# Altium PCB TELEX_CORE_LEFT_V2.0_0817.PcbDoc
Units mil, origin at the board's own origin, x right, y up, seen from the top; angles counter-clockwise.
Board outline 1377.95 x 984.25 mil, 4 copper layers (Top Layer, GND, PWR, Bottom Layer), stack 23.756 mil thick; 71 components, 45 nets, 272 pads, 101 vias.
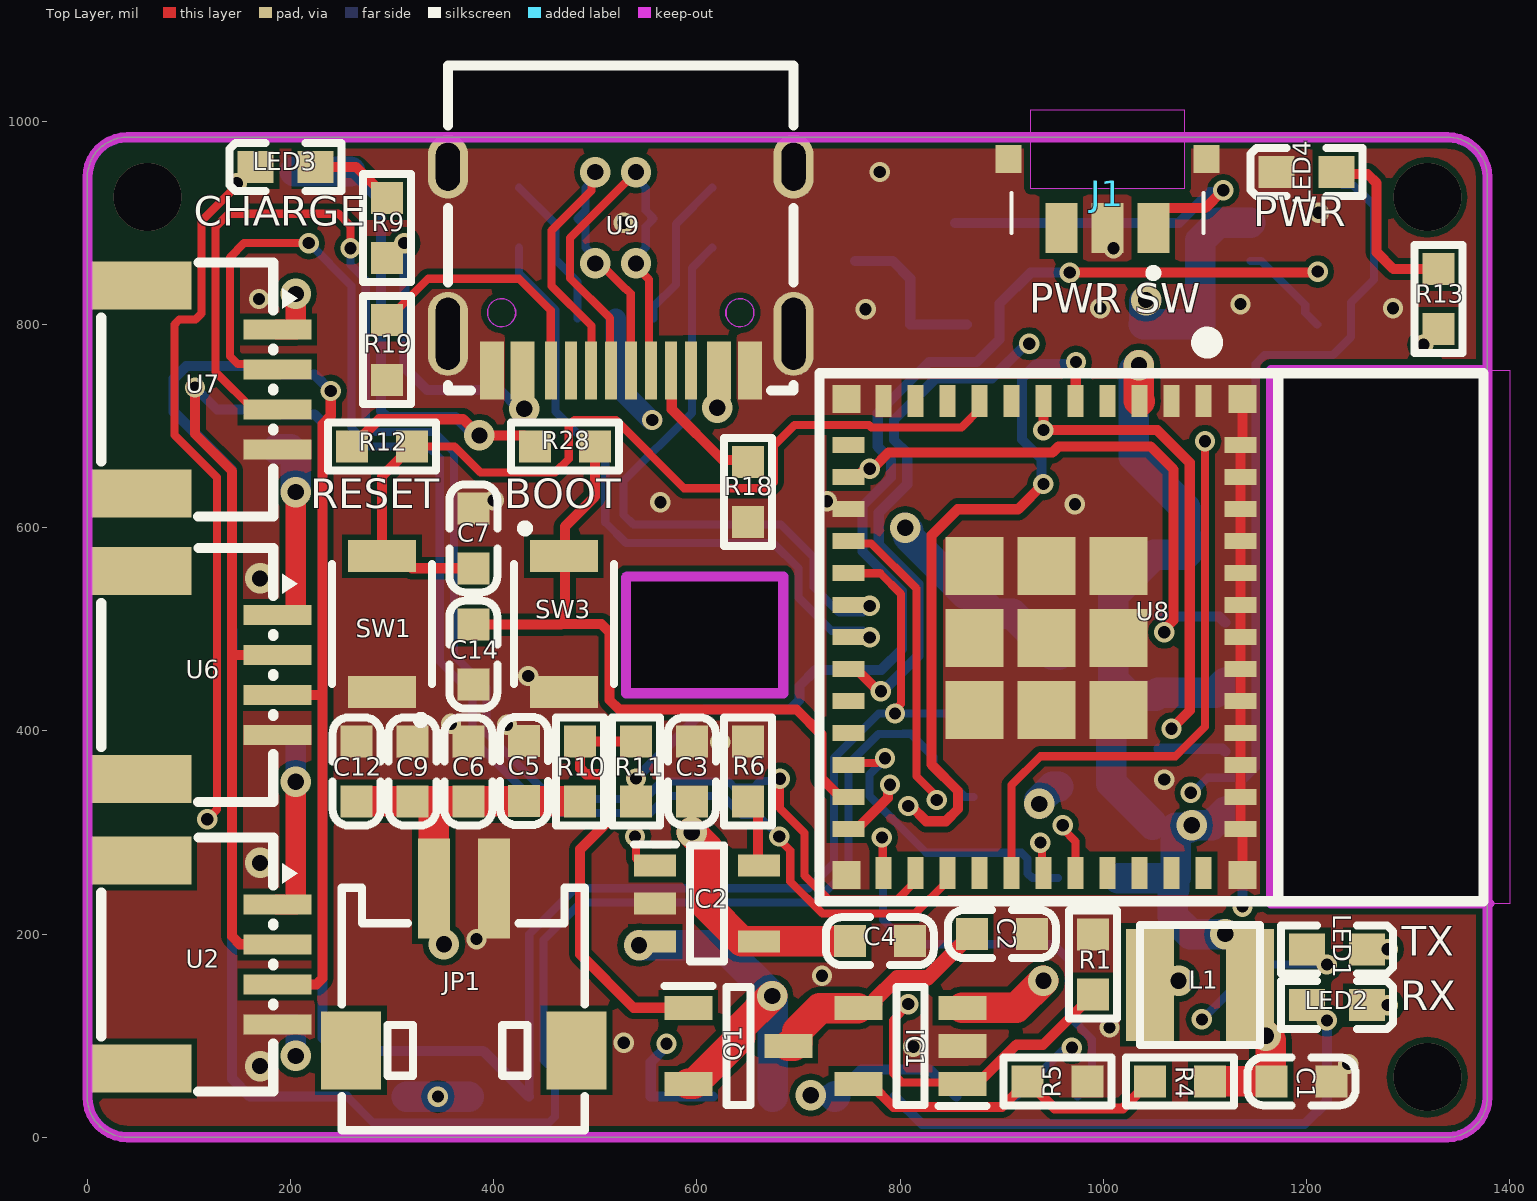
[diagram p0: Top Layer view]
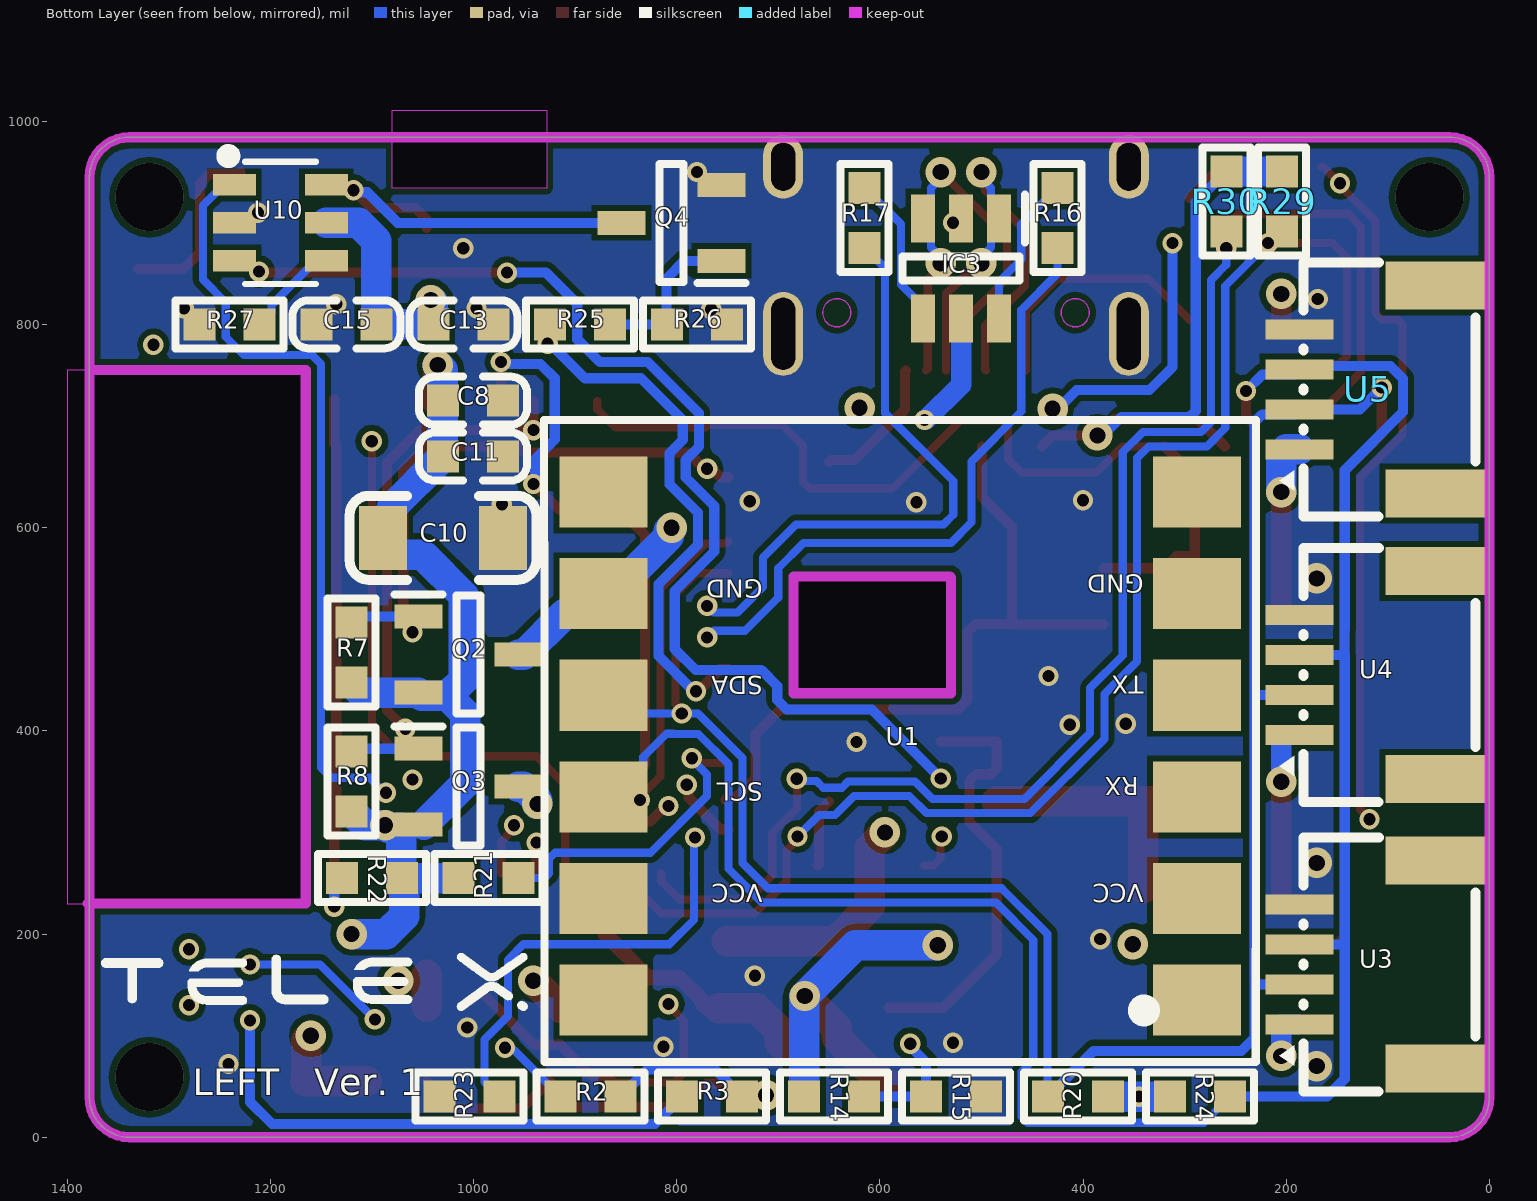
[diagram p1: Bottom Layer view, seen from below]
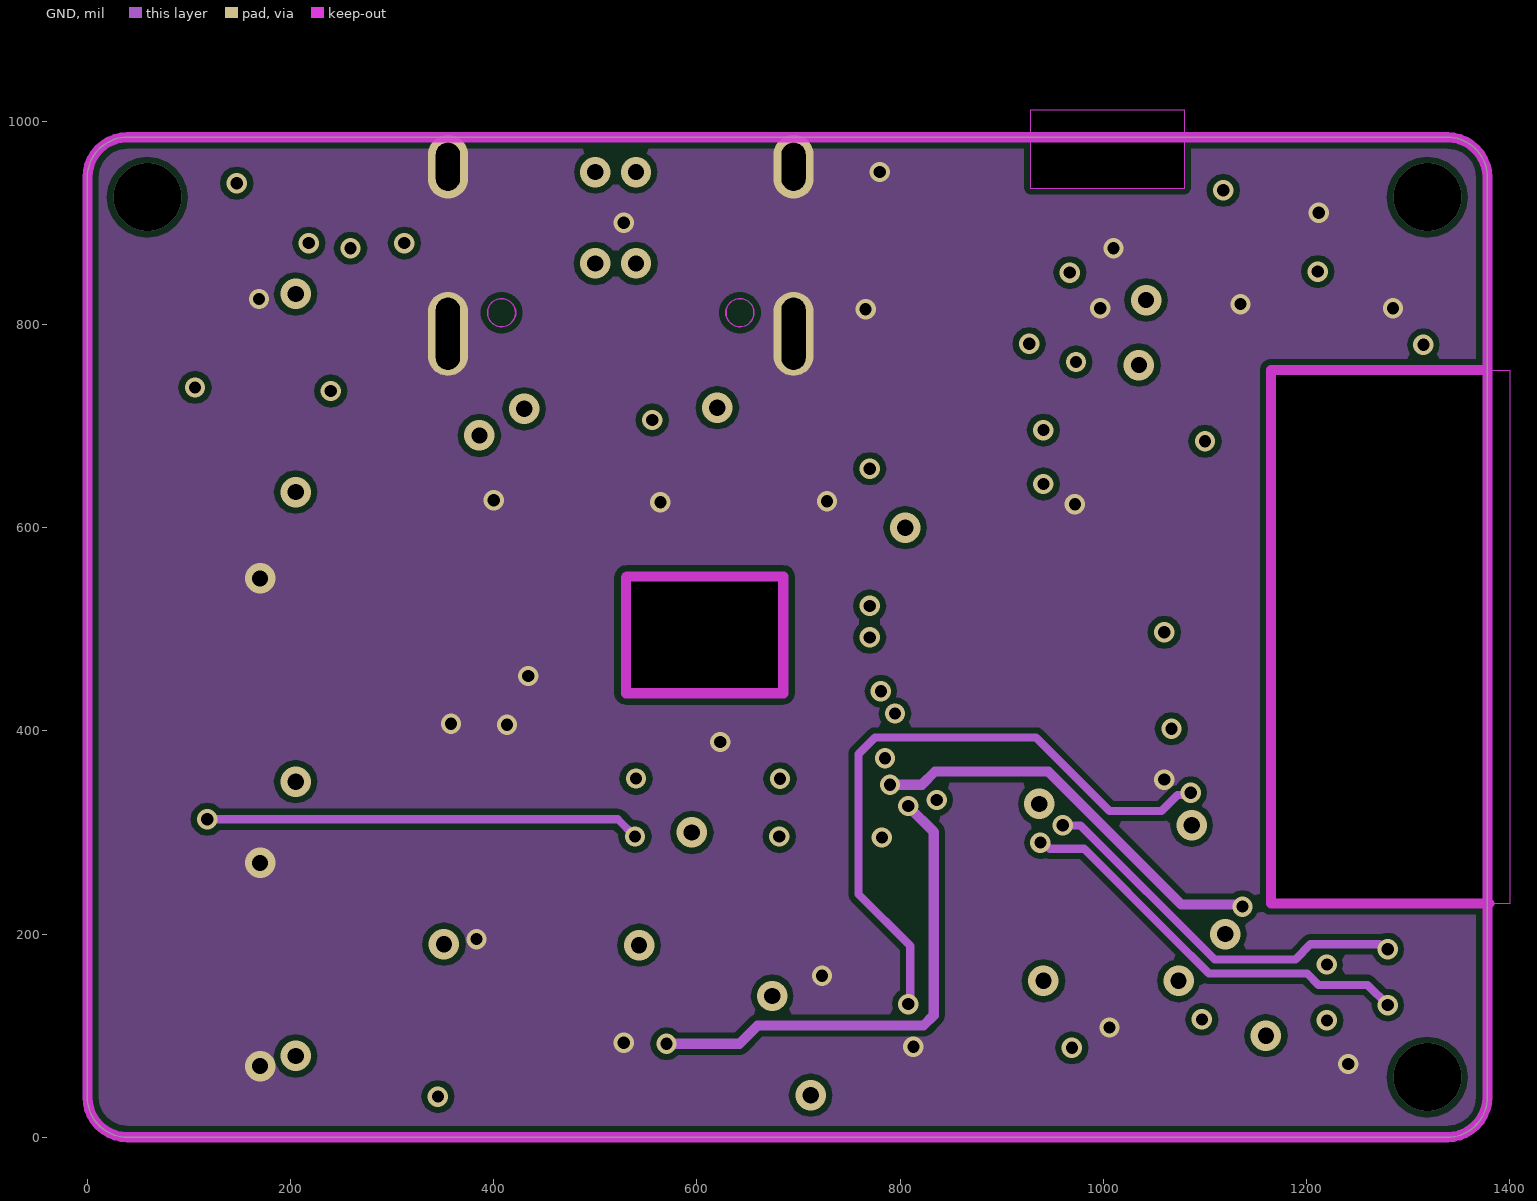
[diagram p2: GND]
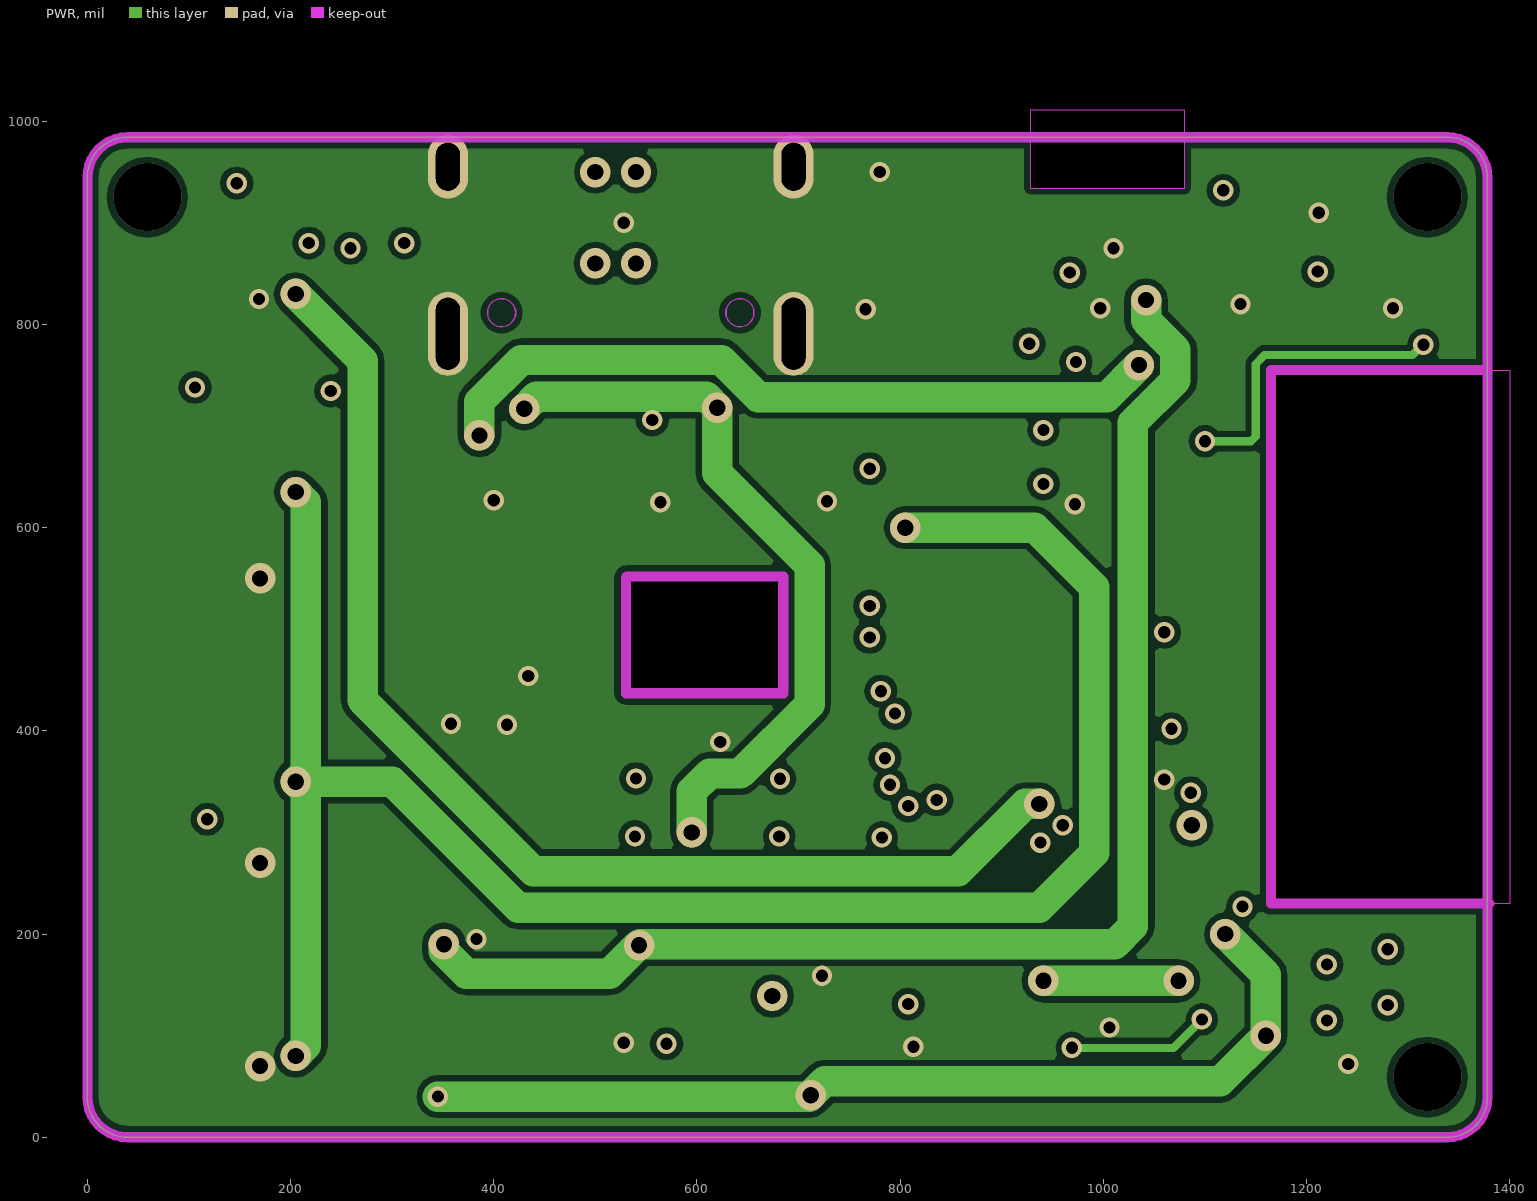
[diagram p3: PWR]
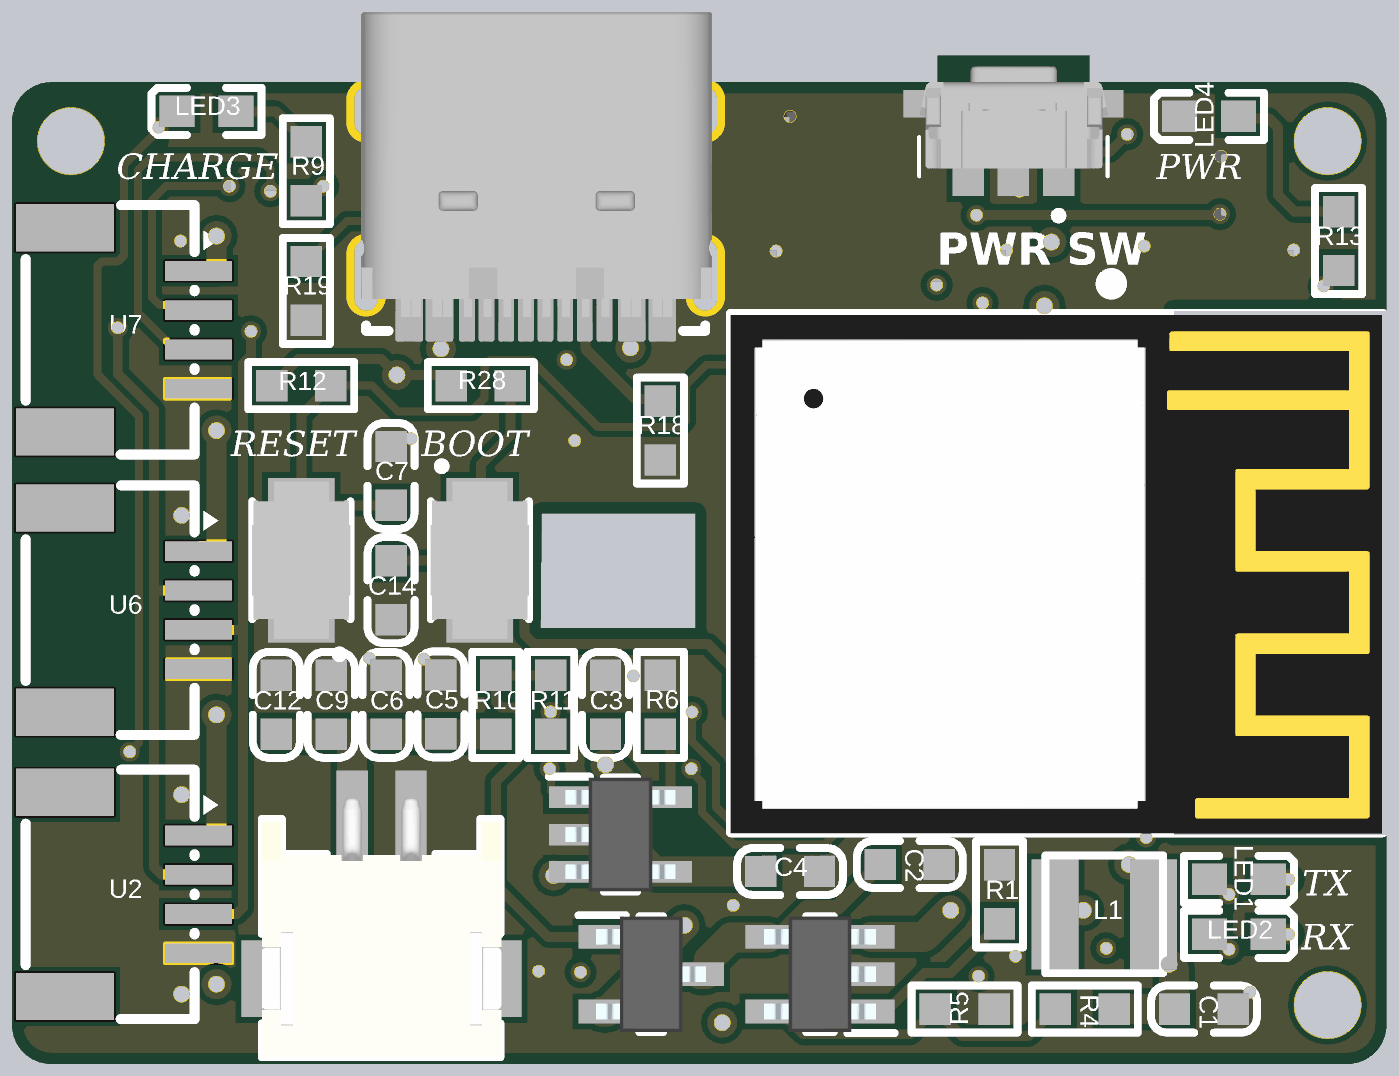
[diagram p4: 3D render of the assembled board from above, using the file's embedded part models]
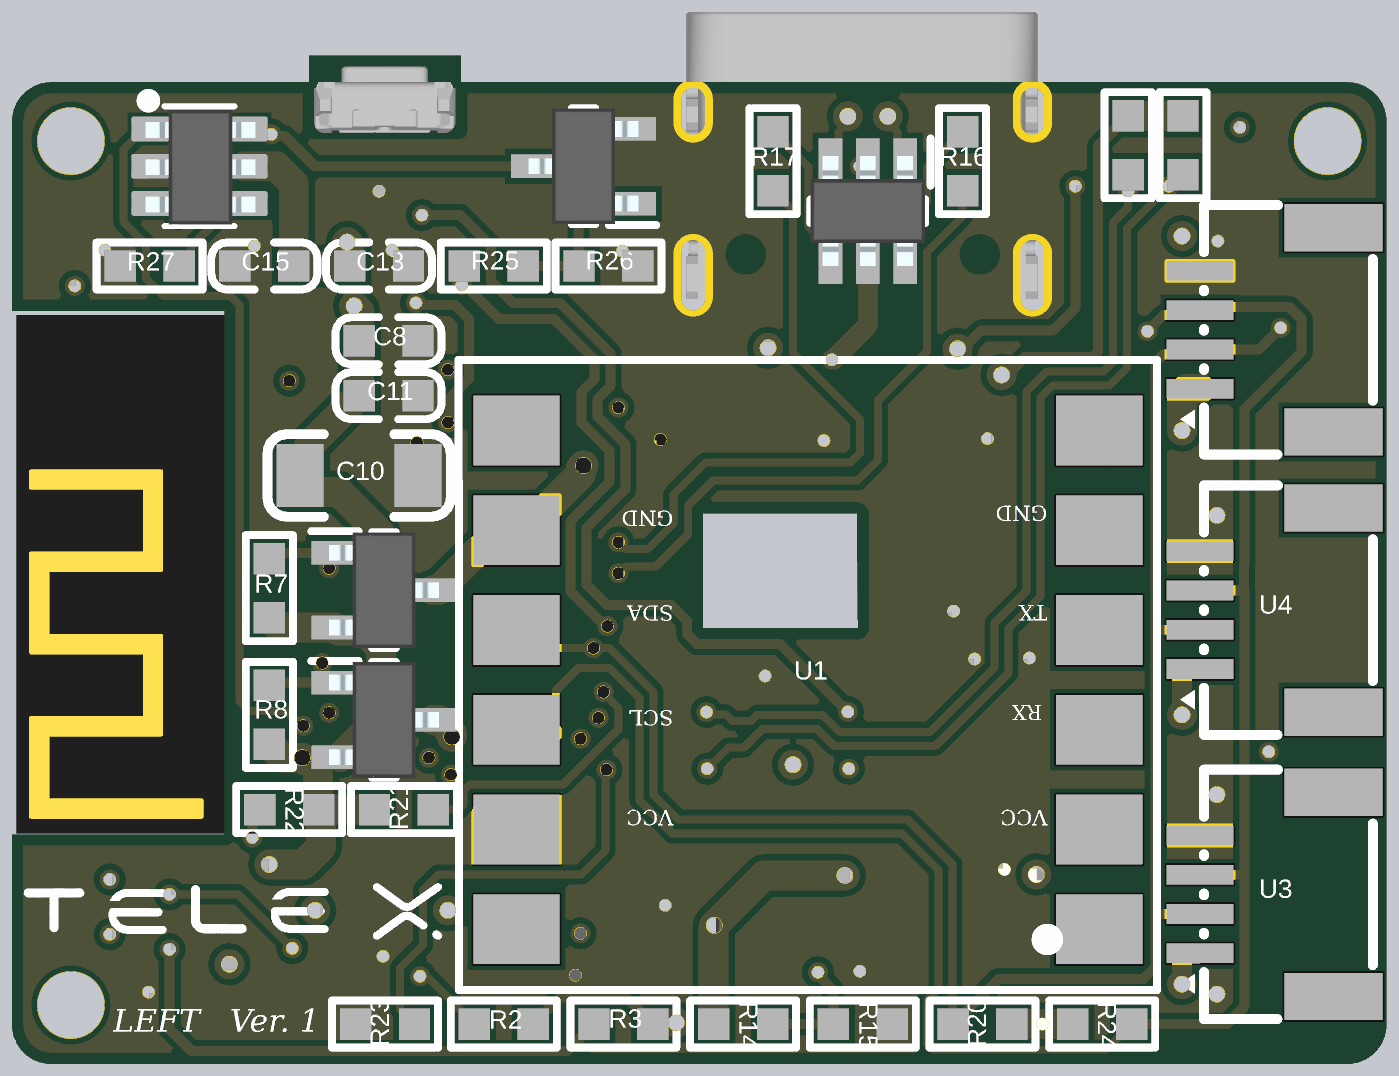
[diagram p5: 3D render of the assembled board from below, using the file's embedded part models]

## Layer stack, top to bottom
Top Solder: solder mask 0.4, Solder Resist, Dk 3.5
Top Layer: signal copper 1.4
Dielectric 2: prepreg 2.8, PP-006, Dk 4.1
GND: signal copper 1.378
Dielectric 1: dielectric 12.6, FR-4, Dk 4.8
PWR: signal copper 1.378
Dielectric 3: prepreg 2.8, PP-006, Dk 4.1
Bottom Layer: signal copper 1.4
Bottom Solder: solder mask 0.4, Solder Resist, Dk 3.5

## Board outline
39.37,0 cw(c39.37,39.37) 0,39.37 0,944.88 cw(c39.37,944.88) 39.37,984.25 1338.58,984.25 cw(c1338.58,944.88) 1377.95,944.88 1377.95,39.37 cw(c1338.58,39.37) 1338.58,0
cut-out: 928,1011 928,934 1080,934 1080,1011
cut-out: 1165,755 1400,755 1400,230 1165,230
cut-out: 530,437 685,437 685,552 531,552

## Design rules (kind name [scope] priority, off if disabled: settings)
Clearance [All] p1: gap=6 ignorepadtopadclearanceinfootprint=TRUE except(0: Arc-Text Track-Text SMDPad-Text THPad-Text Via-Text Fill-Text Poly-Text Region-Text Text-Text)
DiffPairsRouting [All] p1: maxlimit=10 minlimit=10 mostfreqgap=10 toplayer_minwidth=5 toplayer_maxwidth=15 toplayer_prefwidth=15 midlayer1_minwidth=5 midlayer1_maxwidth=15 midlayer1_prefwidth=15 midlayer2_minwidth=5 midlayer2_maxwidth=15 midlayer2_prefwidth=15 bottomlayer_minwidth=5 bottomlayer_maxwidth=15 bottomlayer_prefwidth=15 maxuncoupledlength=500
HoleToHoleClearance [All] p1: gap=0 allowstackedmicrovias=TRUE
MinimumSolderMaskSliver [All] p1: minsoldermaskwidth=0
PolygonConnect [All] p1: connectstyle=Direct reliefconductorwidth=10 reliefentries=4 polygonreliefangle="90 Angle" airgapwidth=10
RoutingVias [All] p1: holewidth=28 width=50 viastyle="Through Hole" minholewidth=28 minwidth=50 maxholewidth=28 maxwidth=50
SilkToSilkClearance [All] p1: silktosilkclearance=0
SilkToSolderMaskClearance [IsPad] p1: minsilkscreentomaskgap=0 clearancetoexposedcopper=TRUE
SolderMaskExpansion [All] p1: expansion=0 istentingtop=FALSE
SupplyNets "Schematic Supply Nets_4" [InNet('VUSB')] p1: voltage=0.000
SupplyNets "Schematic Supply Nets_3" [InNet('VIN')] p2: voltage=0.000
SupplyNets "Schematic Supply Nets_2" [InNet('+3.3V')] p3: voltage=0.000
SupplyNets "Schematic Supply Nets_1" [InNet('VBAT')] p4: voltage=0.000
SupplyNets "Schematic Supply Nets" [InNet('GND')] p5: voltage=0.000
Width [All] p1: maxlimit=9999 minlimit=5 preferedwidth=10 minimp=50.000000 maximp=50.000000 favimp=50.000000
25 further rules are at their usual default settings.

## Classes and differential pairs
differential pair PROC: +PROC_P -PROC_N
differential pair D: +D_P -D_N

## Components (designator, comment, footprint, x,y, rotation, side; value= is the part's Value field where it differs from the comment)
C1 "22uF" C0603 1195,55 r180 top
C2 "10uF" C0603 900,200 r0 top
C3 "10nF" C0603 595,360 r270 top
C4 "100nF" C0603 780,193 r180 top
C5 "22uF" C0603 430,360.47 r270 top
C6 "22uF" C0603 375,360 r270 top
C7 "1uF" C0603 380,589.53 r90 top
C8 "10uF" C0603 1000.47,725 r0 bottom
C9 "100nF" C0603 320,360 r270 top
C10 "100uF" C1206 1030,590 r0 bottom
C11 "100nF" C0603 1000.47,670 r0 bottom
C12 "22uF" C0603 265,360 r270 top
C13 "100nF" C0603 1010,800 r0 bottom
C14 "1uF" C0603 380,475 r270 top
C15 "1uF" C0603 1125,800 r180 bottom
IC1 "SY8089AAC" SOT95P285X140-5N 810,90 r180 top
IC2 "TP4054-42-SOT25-R" SOT95P280X100-5N 610,230 r0 top
IC3 "USBLC6-2SC6" SOT95P280X145-6N 520,855 r270 bottom
J1 "EVPAEDB2A" EVPAEJB2A 1003.94,915 r180 top
JP1 "HDR-1X2" ZH1.5-WS-2P 370.47,85.55 r0 top
L1 "2.2uH" L3030 1095,150 r180 top
LED1 "LED_RED" LED0603_RED 1230,185 r0 top
LED2 "LED_GREEN" LED0603_GREEN 1230,130 r0 top
LED3 "LED_BLUE" LED0603_BLUE 195,955 r180 top
LED4 "LED_BLUE" LED0603_BLUE 1200,950 r180 top
Q1 "AO3401A" SOT95P280X125-3N 640.79,90 r0 top
Q2 "AO3401A" SOT95P280X125-3N 1005,475 r180 bottom
Q3 "AO3401A" SOT95P280X125-3N 1005,345 r180 bottom
Q4 "AO3400A" SOT95P280X125-3N 805,900 r0 bottom
R1 "100K" R0603 990,170 r270 top
R2 "1K" R0603 885,40 r0 bottom
R3 "1K" R0603 765,40 r0 bottom
R4 "450K" R0603 1075.47,55 r0 top
R5 "100K" R0603 955,55 r0 top
R6 "2K" R0603 650,360 r270 top
R7 "10K" R0603 1120,477 r90 bottom
R8 "10K" R0603 1120,350 r90 bottom
R9 "1K" R0603 295,895 r90 top
R10 "10K" R0603 485,360 r90 top
R11 "100Ω" R0603 540,360 r270 top
R12 "10K" R0603 290,680 r0 top
R13 "2K" R0603 1330,825 r90 top
R14 "10K" R0603 645,40 r180 bottom
R15 "22K" R0603 525,40 r180 bottom
R16 "22Ω" R0603 425,905 r90 bottom
R17 "22Ω" R0603 615,905 r90 bottom
R18 "5.1K" R0603 650,635 r90 top
R19 "5.1K" R0603 295,775 r90 top
R20 "4.7K" R0603 405,40 r0 bottom
R21 "10K" R0603 985,255 r0 bottom
R22 "10K" R0603 1100,255 r180 bottom
R23 "10K" R0603 1004,40 r0 bottom
R24 "4.7K" R0603 285,40 r180 bottom
R25 "1K" R0603 895,800 r0 bottom
R26 "47K" R0603 780,800 r0 bottom
R27 "10K" R0603 1240,800 r180 bottom
R28 "10K" R0603 470,680 r0 top
R29 "4.7K" R0603 204,921 r270 bottom
R30 "4.7K" R0603 259,921 r270 bottom
SW1 "B3U-1000P" B3U-1000P 290,505 r270 top
SW3 "B3U-1000P" B3U-1000P 469,505 r90 top
U1 "JY901S" JY901S 580,385 r0 bottom
U2 "SH1.0-4P" SH1.0-4PWT 120,170 r270 top
U3 "SH1.0-4P" SH1.0-4PWT 120,170 r90 bottom
U4 "SH1.0-4P" SH1.0-4PWT 120,455 r90 bottom
U5 "SH1.0-4P" SH1.0-4PWT 120,736 r90 bottom
U6 "SH1.0-4P" SH1.0-4PWT 120,455 r270 top
U7 "SH1.0-4P" SH1.0-4PWT 120,736 r270 top
U8 "ESP32-C6-MINI-1" ESP32-C6-MINI-1 942.09,492.13 r270 top locked
U9 "TYPE-C" USB-C-SMD_TYPEC-304-BCP16 525,855 r180 top locked
U10 "UOV-K20" UOV-K20 1190,900 r270 bottom

## Footprints (in the part's own frame and the unit in brackets; to place one, negate y for a bottom-side part, rotate by r counter-clockwise, add the part's x,y. Pads: shape width x height; smd on the part's side, far side on the other; paste and mask are expansions set on the pad)
B3U-1000P [mm] "两脚小龟"
  rect 0.8x1.7 smd: 1(1.7,0) 2(-1.7,0)
  silkscreen extent -1.5,-1.25 2.49,1.25, body extent -2,-1.25 2,1.25, height 1.6
C0603 [mm] "Chip Capacitor, 2-Leads, Body 1.6x0.8mm, IPC Medium Density"
  rect 0.8x0.8 smd: 1(-0.75,0) 2(0.75,0)
  silkscreen extent -1.35,-0.6 1.35,0.6, body extent -1.26,-0.4 1.26,0.4, height 0.5
C1206 [mm] "Chip Capacitor, 2-Leads, Body 3.2x1.6mm, IPC Medium Density"
  rect 1.2x1.6 smd: 1(-1.5,0) 2(1.5,0)
  silkscreen extent -2.33,-1.05 2.33,1.05, body extent -1.6,-0.8 1.6,0.8, height 1
ESP32-C6-MINI-1 [mm] "带天线"
  rect 0.8x0.4 smd paste+0 mask+0.05: 1(-5.9,3.975) 2(-5.9,3.175) 3(-5.9,2.375) 4(-5.9,1.575) 5(-5.9,0.775) 6(-5.9,-0.025) 7(-5.9,-0.825) 8(-5.9,-1.625) 9(-5.9,-2.425) 10(-5.9,-3.225) 11(-5.9,-4.025) 25(5.9,-4.025) 26(5.9,-3.225) 27(5.9,-2.425) 28(5.9,-1.625) 29(5.9,-0.825) 30(5.9,-0.025) 31(5.9,0.775) 32(5.9,1.575) 33(5.9,2.375) 34(5.9,3.175) 35(5.9,3.975)
  rect 0.4x0.8 smd paste+0 mask+0.05: 12(-4.8,-4.9) 13(-4,-4.9) 14(-3.2,-4.9) 15(-2.4,-4.9) 16(-1.6,-4.9) 17(-0.8,-4.9) 18(0,-4.9) 19(0.8,-4.9) 20(1.6,-4.9) 21(2.4,-4.9) 22(3.2,-4.9) 23(4,-4.9) 24(4.8,-4.9) 36(4.8,4.9) 37(4,4.9) 38(3.2,4.9) 39(2.4,4.9) 40(1.6,4.9) 41(0.8,4.9) 42(0,4.9) 43(-0.8,4.9) 44(-1.6,4.9) 45(-2.4,4.9) 46(-3.2,4.9) 47(-4,4.9) 48(-4.8,4.9)
  rect 1.45x1.45 smd paste+0 mask+0.05: 49(-1.775,1.85) 49(-1.775,0.05) 49(-1.775,-1.75) 49(0.025,1.85) 49(0.025,0.05) 49(0.025,-1.75) 49(1.825,1.85) 49(1.825,0.05) 49(1.825,-1.75)
  rect 0.7x0.7 smd paste+0 mask+0.05: 50(5.95,4.95) 51(5.95,-4.95) 52(-5.95,-4.95) 53(-5.95,4.95)
  silkscreen extent -7.57,-5.62 6.6,10.98, body extent -6.57,-5.64 6.63,10.96, height 2.46
EVPAEJB2A [mm]
  rect 0.8x1.25 smd: 1(-1.15,0.512) 2(0,0.512) 3(1.15,0.512)
  rect 0.65x0.7 smd: 4(-2.475,-1.213) 5(2.475,-1.213)
  silkscreen extent -2.4,-0.36 2.4,1.74, body extent -2.41,-2.16 2.39,0.44, height 0.97
JY901S [mil]
  rect 86.61x70 smd paste+0 mask+1.97: 1(-292.13,250) 2(-292.13,150) 3(-292.13,50) 4(-292.13,-50) 5(-292.13,-150) 6(-292.13,-250) 7(292.14,-250) 8(292.14,-150) 9(292.14,-50) 10(292.14,50) 11(292.14,150) 12(292.14,250)
  silkscreen extent -350,-321 351,311, body extent -294,-304 306,296, height 119
L3030 [mm]
  rect 1.2x2.8 smd: 1(-1.25,0) 2(1.25,0)
  silkscreen extent -1.5,-1.5 1.5,1.5, body extent -1.5,-1.5 1.5,1.5, height 1.2
LED0603_BLUE [mm]
  rect 0.9x0.8 smd: 1(-0.75,0) 2(0.75,0)
  silkscreen extent -1.4,-0.6 1.4,0.6, body extent -1.3,-0.41 1.3,0.41, height 0.54
LED0603_GREEN [mm]
  rect 0.9x0.8 smd: 1(-0.75,0) 2(0.75,0)
  silkscreen extent -1.4,-0.6 1.4,0.6, body extent -1.3,-0.41 1.3,0.41, height 0.54
LED0603_RED [mm]
  rect 0.9x0.8 smd: 1(-0.75,0) 2(0.75,0)
  silkscreen extent -1.4,-0.6 1.4,0.6, body extent -1.3,-0.41 1.3,0.41, height 0.54
R0603 [mm] "Chip Capacitor, 2-Leads, Body 1.6x0.8mm, IPC Medium Density"
  rect 0.8x0.8 smd: 1(-0.75,0) 2(0.75,0)
  silkscreen extent -1.35,-0.6 1.35,0.6, body extent -1.3,-0.4 1.3,0.4, height 0.4
SH1.0-4PWT [mm]
  rect 0.5x1.7 smd paste+0 mask+0.05: 1(-1.5,1.7) 2(-0.5,1.7) 3(0.5,1.7) 4(1.5,1.7)
  rect 1.2x2.5 smd paste+0 mask+0.05: 5(2.6,-1.7) 6(-2.6,-1.7)
  silkscreen extent -3.18,-2.7 3.18,2.21
SOT95P280X100-5N [mm]
  rect 1.05x0.55 smd: 1(-1.3,0.95) 2(-1.3,0) 3(-1.3,-0.95) 4(1.3,-0.95) 5(1.3,0.95)
  silkscreen extent -1.83,-1.45 0.43,1.48, body extent -1.4,-1.45 1.4,1.45, height 1
SOT95P280X125-3N [mm]
  rect 1.2x0.6 smd: 1(-1.25,0.95) 2(-1.25,-0.95) 3(1.25,0)
  silkscreen extent -1.85,-1.48 0.3,1.5, body extent -1.4,-1.48 1.4,1.48, height 1.25
SOT95P280X145-6N [mm]
  rect 1.2x0.6 smd: 1(-1.25,0.95) 2(-1.25,0) 3(-1.25,-0.95) 4(1.25,-0.95) 5(1.25,0) 6(1.25,0.95)
  silkscreen extent -1.85,-1.46 0.3,1.6, body extent -1.4,-1.46 1.4,1.46, height 1.45
SOT95P285X140-5N [mm]
  rect 1.2x0.6 smd: 1(-1.3,0.95) 2(-1.3,0) 3(-1.3,-0.95) 4(1.3,-0.95) 5(1.3,0.95)
  silkscreen extent -1.9,-1.48 0.35,1.5, body extent -1.43,-1.48 1.43,1.48, height 1.4
UOV-K20 [mil]
  rect 20.95x42.2 smd paste+2: 1(-37.4,-45.24) 2(0,-45.24) 3(37.4,-45.24) 4(37.4,45.24) 5(0,45.24) 6(-37.4,45.24)
  silkscreen extent -72,-57 60,35, body extent -57,-54 59,56, height 57
USB-C-SMD_TYPEC-304-BCP16 [mm]
  oval 1x2.1 hole 0.6 slot 1.8 at 90 deg paste-2539.97: 13(-4.32,1.633) 14(4.32,1.633)
  oval 1x1.6 hole 0.6 slot 1.2 at 90 deg paste-2539.97: 15(-4.32,-2.547) 16(4.32,-2.547)
  rect 0.6x1.45 smd paste+0.051: A1B12(-3.225,2.547) A4B9(-2.45,2.547) B1A12(3.22,2.547) B4A9(2.45,2.547)
  rect 0.3x1.45 smd paste+0.051: A5(-1.25,2.547) A6(-0.25,2.547) A7(0.25,2.547) A8(1.25,2.547) B5(1.75,2.547) B6(0.75,2.547) B7(-0.75,2.547) B8(-1.75,2.547)
  Keep-Out Layer circle w0.003: c-2.98,1.103 r0.35
  Keep-Out Layer circle w0.003: c2.98,1.103 r0.35
  Keep-Out Layer region: -2.63,1.103 -2.63,1.033 -2.683,0.904 -2.782,0.806 -2.91,0.753 -3.05,0.753 -3.178,0.806 -3.277,0.904 -3.33,1.033 -3.33,1.103 -3.33,1.172 -3.277,1.301 -3.178,1.399 -3.05,1.453 -2.91,1.453 -2.782,1.399 -2.683,1.301 -2.63,1.172 -2.63,1.103 -2.63,1.103
  Keep-Out Layer region: -2.63,1.103 -2.63,1.033 -2.683,0.904 -2.782,0.806 -2.91,0.753 -3.05,0.753 -3.178,0.806 -3.277,0.904 -3.33,1.033 -3.33,1.103 -3.33,1.172 -3.277,1.301 -3.178,1.399 -3.05,1.453 -2.91,1.453 -2.782,1.399 -2.683,1.301 -2.63,1.172 -2.63,1.103 -2.63,1.103
  Keep-Out Layer region: 3.33,1.103 3.33,1.033 3.277,0.904 3.178,0.806 3.05,0.753 2.911,0.753 2.782,0.806 2.683,0.904 2.63,1.033 2.63,1.103 2.63,1.172 2.683,1.301 2.782,1.399 2.911,1.453 3.05,1.453 3.178,1.399 3.277,1.301 3.33,1.172 3.33,1.103 3.33,1.103
  Keep-Out Layer region: 3.33,1.103 3.33,1.033 3.277,0.904 3.178,0.806 3.05,0.753 2.911,0.753 2.782,0.806 2.683,0.904 2.63,1.033 2.63,1.103 2.63,1.172 2.683,1.301 2.782,1.399 2.911,1.453 3.05,1.453 3.178,1.399 3.277,1.301 3.33,1.172 3.33,1.103 3.33,1.103
  silkscreen extent -4.32,-5.08 4.32,3.05, body extent -4.5,-5.06 4.44,2.69, height 3.2
ZH1.5-WS-2P [mm] "����6.1mm�����2.5mm���ߣ�3.7mm"
  rect 1.5x1.95 smd: 0(-2.818,0) 0(2.818,0)
  rect 0.8x2.5 smd: 1(-0.75,4.05) 2(0.75,4.05)
  silkscreen extent -3.05,-2 3.03,4.06, body extent -3.05,-2 3.05,4.6, height 3.75

## Part data
C1 C2 C3 C4 C5 C6 C7 C8 C9 C10 C11 C12 C13 C14 C15: library part CC, "瓷片电容", 品牌=muRata, 材质=X7R, 类别=电容, 精度=20%, 耐压=25V
IC1: "Integrated Circuit", Manufacturer_Name=Silergy, Datasheet Link=https://datasheet.lcsc.com/szlcsc/Silergy-Corp-SY8089AAAC_C78988.pdf, Height=1.4mm, Manufacturer_Part_Number=SY8089AAC
IC2: "Integrated Circuit", Manufacturer_Name="TOP POWER", Datasheet Link=http://images.100y.com.tw/pdf_file/38-TP-TP4054x.pdf, Height=1mm, Manufacturer_Part_Number=TP4054-42-SOT25-R
IC3: "Integrated Circuit", Manufacturer_Name=STMicroelectronics, Mouser Part Number=511-USBLC6-2SC6, Arrow Part Number=USBLC6-2SC6, Arrow Price/Stock=https://www.arrow.com/en/products/usblc6-2sc6/stmicroelectronics.html?utm_currency=USD&region=nac, Datasheet Link=https://www.st.com/resource/en/datasheet/usblc6-2.pdf, Height=1.45mm, Manufacturer_Part_Number=USBLC6-2SC6, Mouser Price/Stock=https://www.mouser.co.uk/ProductDetail/STMicroelectronics/USBLC6-2SC6?qs=po45yt2pPpu%2FhNIlwQdTlg%3D%3D
J1: "Connector", Manufacturer_Name=Panasonic, Arrow Part Number=EVPAEDB2A, Arrow Price/Stock=https://www.arrow.com/en/products/evp-aedb2a/panasonic, Datasheet Link=https://industry.panasonic.com/ac/cdn/e/control/switch/light-touch/catalog/sw_lt_eng_4522s_side_eg.pdf, Height=1.75mm, Manufacturer_Part_Number=EVPAEDB2A
JP1: library part "Header 2", "2P接插件", BOM名称=2P接插件, 学习资源=www.ooocke.com, 版权归属=源创客
L1: library part LG, "功率电感", 品牌=顺络, 类别=电感, 精度=20%, 高度=2.0
LED1: "发光二极管（红）"
LED2: "发光二极管（绿）"
LED3 LED4: "发光二极管（蓝）"
Q1 Q2 Q3: "MOSFET (P-Channel)", Manufacturer_Name="Alpha & Omega Semiconductors", Arrow Part Number=AO3401A, Arrow Price/Stock=https://www.arrow.com/en/products/ao3401a/alpha-and-omega-semiconductor.html?utm_currency=USD&region=europe, Datasheet Link=http://www.aosmd.com/pdfs/datasheet/AO3401A.pdf, Height=1.25mm, Manufacturer_Part_Number=AO3401A
Q4: "MOSFET (N-Channel)", Manufacturer_Name="Alpha & Omega Semiconductors", Arrow Part Number=AO3400A, Arrow Price/Stock=https://www.arrow.com/en/products/ao3400a/alpha-and-omega-semiconductor?utm_currency=USD&region=nac, Datasheet Link=http://aosmd.com/res/data_sheets/AO3400A.pdf, Height=1.25mm, Manufacturer_Part_Number=AO3400A
R1 R2 R3 R4 R5 R6 R7 R8 R9 R10 R11 R12 R13 R14 R15 R16 R17 R18 R19 R20 R21 R22 R23 R24 R25 R26 R27 R28 R29 R30: library part R, "贴片电阻", 品牌=国巨, 材质=薄膜, 类别=电阻, 精度=1%

## Via types
v1: diameter 20, hole 12, Top Layer to Bottom Layer, tented both sides, 70 vias
v2: diameter 30, hole 16, Top Layer to Bottom Layer, tented both sides, 28 vias
v3: diameter 66.93, hole 66.93, Top Layer to Bottom Layer, tented both sides, 3 vias

## Nets (pads, with @x,y where several pads share a name; then routed paths per layer and width w, separated by ;. In a path a pad name is that pad's centre, name@x,y a point inside that pad or via, vN(x,y) a via of type N, cw(c..) or ccw(c..) an arc to the next point about the centre after c; other vN are vias at no path point)
+3.3V: C1.2 C8.2 C10.2 C11.2 L1.1 Q2.2 Q3.2 R2.1 R3.1 R4.2 R7.1 R8.1 R12.1 R20.1 R21.2 R22.2 R24.1 R28.1 R29.1 R30.1 U8.3 | length 3536.1
  Top Layer w10: R12.1 287.22,706.75 369.86,706.75 v2(385.86,690.75) 429.72,690.75 R28.1
  Top Layer w30: v2(1035,760) 1035,725 U8.3 ; R4.2 C1.2 1164.72,55.75 1164.72,95.28 v2(1160,100)
  PWR w30: v1(345,40) 710.63,40 725.63,55 1115,55 v2(1160,100) 1160,160 v2(1120,200) ; v2(385.86,690.75) 385.86,723.77 427.09,765 623.91,765 660.53,728.38 1003.38,728.38 v2(1035,760)
  Bottom Layer w10: R30.1 289,920.53 289,714.86 294.86,709 362.2,709 380.45,690.75 v2(385.86,690.75) ; R3.1@744.65,49.17 762.22,66.75 828.72,66.75 844.72,50.75 R2.1
  Bottom Layer w30: R29.1 R30.1 ; R24.1 v1(345,40) R20.1 ; R3.1 R3.1@736,40.53 ; R21.2 R22.2 ; v2(1035,760) 1030,755 C8.2 C11.2 1080.43,619.57 1080.43,590.75 1089.06,582.13 1080.43,573.5 1050.18,573.5 1009.59,532.91 1009.59,450.39 1025.57,434.41 ; Q3.2@1048.78,307.6 1008,348.38 1008,416.84 1025.57,434.41 ; 1071.22,291.22 1071.22,255.75 R22.2 ; Q3.2@1071.22,304.41 1084.41,304.41 v2(1087,307) 1106.53,307 R8.1 ; v2(1120,200) 1085.76,200 1068.18,217.57 1068.18,242.43 1069.72,243.97 1069.72,254.25 R22.2 ; R7.1 1110.13,437.6 Q2.2 1051.02,434.41 1025.57,434.41
  other v2: 712,41.37
BAT: R14.2 R15.1 U8.5 | length 1292.7
  Top Layer w10: v1(808,326) 810.71,326 825.71,311 845,311 857,323 857,340.7 831,366.7 831,554.5 831,592.46 856.64,618.1 916.1,618.1 v1(941,643) ; U8.5 972.8,724.61 972.8,762.8 v1(973,763)
  GND w10: v1(570,92) 641.85,92 659.85,110 823,110 833,120 833,300.57 808,325.57 v1(808,326)
  Bottom Layer w10: v1(570,92) 570,89.29 554.53,73.82 R15.1 R14.2 ; v1(941,643) 939.09,644.91 939.09,667.62 920,686.71 920,747 934.09,761.09 971.09,761.09 v1(973,763)
D_N: IC3.3 U9.A7 U9.B7 | length 454.6
  Top Layer w8: U9.A7 514.32,755.55 514.32,806.14 475,845.46 475,885 v2(540,950) ; v2(540,860) 540,857.16 552.84,844.31 552.84,756.4 U9.B7
  Bottom Layer w8: v2(540,860) 540,865.95 549.59,875.54 549.59,896.4 IC3.3 549.59,912.02 549.59,934.46 540,944.05 v2(540,950)
D_P: IC3.1 U9.A6 U9.B6 | length 456.9
  Top Layer w8: U9.B6 496.32,755.55 496.32,798.68 457,838 457,892.46 496.18,931.64 496.18,946.18 v2(500,950) ; v2(500,860) 504.64,860 529.64,835 530.16,835 534.84,830.31 U9.A6
  Bottom Layer w8: v2(500,860) 500,865.95 490.41,875.54 490.41,896.4 IC3.1 490.41,912.02 490.41,934.46 500,944.05 v2(500,950)
GND: C1.1 C2.2 C3.1 C4.1 C5.1 C6.1 C7.2 C8.1 C9.1 C10.1 C11.1 C12.1 C13.1 C14.2 C15.1 IC1.2 IC2.2 IC3.2 J1.2 J1.4 J1.5 JP1.2 LED4.2 Q4.2 R1.1 R5.2 R6.1 R15.2 R18.1 R19.1 R23.2 R26.1 R27.1 SW1.1 SW3.2 U1.11 U2.4 U3.4 U4.4 U5.4 U6.4 U7.4 U8.1 U8.2 U8.11 U8.14 U8.36 U8.37 U8.38 U8.39 U8.40 U8.41 U8.42 U8.43 U8.44 U8.45 U8.46 U8.47 U8.48 U8.49 U8.50 U8.51 U8.52 U8.53 U9.13 U9.14 U9.15 U9.16 U9.A1B12 U9.B1A12 U10.2 | length 470.1
  Top Layer w10: U8.50 1136.97,301.18 U8.36 U8.37 U8.38 U8.39 U8.40 U8.41 U8.42 U8.43 U8.44 U8.45 U8.46 U8.47 U8.48 1136.97,683.07 U8.53
  other v1: 1241,72 813,89 528,93 1006,108 723,159 383,195 1060,352 623,389 413,406 358,407 434,454 972,623 564,625 728,626 400,627 766,815 997,816 1285,816 1135,820 169,825 1010,875 528,900 1212,910 780,950
  other v2: 170,70 170,270 170,550
IMU: Q2.3 U1.8 U2.1 U3.1 U4.1 U5.1 U6.1 | length 2556.8
  Top Layer w20: U2.1 204.84,229.05 205,229.21 v2(205,350) ; U6.1 204.84,514.05 205,514.21 v2(205,635)
  PWR w30: v2(205,80) 215,90 215,340 v2(205,350) ; v2(205,635) 215,625 215,360 v2(205,350) ; v2(805,600) 932.43,600 991,541.43 991,280.09 936.91,226 424,226 300,350 v2(205,350)
  Bottom Layer w20: U3.1 204.84,110.95 205,110.79 v2(205,80) ; U4.1 204.84,395.95 205,395.79 v2(205,350)
  Bottom Layer w30: U5.1 199.84,676.95 205,671.79 v2(205,635) ; v2(805,600) 807.83,597.17 807.83,591.3 843.83,555.3 843.83,555 863.83,535 U1.8 892.14,515 910.35,515 950.35,475 Q2.3
IMU_CTRL: Q2.1 R7.2 U8.13 | length 574.1
  Top Layer w10: U8.13 757.05,649.61 763.53,656.09 768.09,656.09 v1(770,658) 772.71,658 788.76,674.06 950.06,674.06 956,680 1046.37,680 1069,657.37 1069,508.71 1060,499.71 v1(1060,497)
  Bottom Layer w10: Q2.1 1114.13,512.4 R7.2
IR: Q3.3 U7.1 | length 1271.2
  Top Layer w20: U7.1 204.84,795.05 205,795.21 v2(205,830)
  PWR w30: v2(205,830) 271,764 271,429.91 438.91,262 857,262 923,328 v2(937,328)
  Bottom Layer w30: v2(937,328) 937,331.65 950.35,345 Q3.3
IR_CTRL: Q3.1 R8.2 U8.6 | length 522.1
  Top Layer w10: U8.6 U8.6 941.05,696.05 v1(941,696) 1053,696 1085,664 1085,420 v1(1067,402)
  Bottom Layer w10: Q3.1 1117.13,382.4 R8.2
KEY: J1.1 Q4.3 U10.6 | length 369.3
  Top Layer w10: J1.1@1046.28,894.84 1046.28,903.7 1057.02,914.45 1100.2,914.45 1117.75,932 v1(1118,932)
  Bottom Layer w10: Q4.3 1074.42,900 1104.53,930.11 1116.11,930.11 v1(1118,932)
LP_SCL: R29.2 U7.2 U8.27 | length 1414.7
  Top Layer w8: U7.2 181.6,761.01 147.99,761.01 140.28,768.72 140.28,866 154.28,880 v1(218,880) ; v1(681,296) 681,293.22 691.85,282.37 691.85,251.73 723.49,220.09 814.74,220.09 846.62,251.97 U8.27
  Bottom Layer w8: v1(218,880) 260,838 260,698 278,680 335.32,680 346.86,668.46 346.86,468.34 379,436.2 379,391.92 451.92,319 554.08,319 571.08,336 625.42,336 644.27,317.15 659.85,317.15 v1(681,296)
LP_SDA: R30.2 U7.3 U8.26 | length 1518.3
  Top Layer w8: U7.3 163.31,716.31 126.28,753.34 126.28,896.01 139.27,909 247,909 259,897 v1(259,875) ; v1(681.69,352.83) 681.69,323.6 705.85,299.43 705.85,257.53 729.29,234.09 797.24,234.09 815.12,251.97 U8.26
  Bottom Layer w8: v1(259,875) 259,858.8 274,843.8 274,703.8 283.8,694 341.12,694 360.86,674.26 360.86,474.14 393,442 393,397.72 457.72,333 548.28,333 565.28,350 631.22,350 637.22,344 655.69,344 662.22,350.53 679.39,350.53 v1(681.69,352.83)
NetC7_1: C7.1 R12.2 SW1.2 U8.8 | length 915.6
  Top Layer w8: R12.2 361.25,680 387,654.25 460.36,654.25 473.78,667.67 473.78,699.89 479.64,705.75 520.25,705.75 587.22,638.78 669.89,638.78 675.75,644.64 675.75,680.75 696,701 769.27,701 771.6,698.66 860.24,698.66 878.11,716.54 U8.8
  Top Layer w10: R12.2 290,650.47 SW1.2 307.72,571.93 319.65,560 C7.1
NetC14_1: C14.1 R28.2 SW3.1 U8.23 | length 697.5
  Top Layer w10: C14.1 466.31,504.53 ; R28.2 499.53,630.53 470,601 470,508.22 466.31,504.53 ; U8.23@752.05,331.77 U8.23 741.31,334.64 722.43,353.52 722.43,396.57 698,421 523.37,421 514,430.37 514,497 506,505 466.78,505 466.31,504.53
NetIC1_3: IC1.3 L1.2 | length 255.3
  Top Layer w30: IC1.3 914.4,127.4 v2(941,154) ; L1.2@1045.79,128.5 L1.2@1045.79,160
  PWR w30: v2(941,154) v2(1074,154)
NetIC1_5: IC1.5 R4.1 R5.1 | length 329.2
  Top Layer w10: IC1.5 770.63,52.6 793.44,29.79 900.26,29.79 R5.1 952.22,28.25 1019.2,28.25 R4.1
NetIC2_1: IC2.1 LED3.2 | length 1176.5
  Top Layer w8: v1(118,313) 127.47,322.47 127.47,649.53 85.74,691.26 85.74,800.05 90.42,804.74 106.42,804.74 112.28,810.6 112.28,901.81 151.76,941.28 151.76,943.25 163.5,955 LED3.2 ; v1(539,296) 540.15,294.85 540.15,274.23 546.98,267.4 IC2.1@556.82,267.4
  GND w8: v1(118,313) 522,313 v1(539,296)
  other v1: 147,939
NetIC2_5: IC2.5 R6.2 | length 67.7
  Top Layer w10: R6.2 660,320.47 660,268.58 IC2.5
NetIC3_4: IC3.4 R17.2 | length 152.6
  Bottom Layer w8: IC3.4 557.4,817.6 579.21,839.41 579.21,898.74 R17.2
NetIC3_6: IC3.6 R16.2 | length 152.6
  Bottom Layer w8: R16.2 460.79,898.74 460.79,863.86 482.6,842.05 IC3.6
NetLED1_1: LED1.1 R2.2 | length 359.3
  PWR w8: v1(969,88) 1069,88 v1(1097,116)
  Bottom Layer w8: R2.2 960.23,85.7 966.7,85.7 v1(969,88) ; v1(1097,116) 1151,170 v1(1220,170)
NetLED2_1: LED2.1 R3.2 | length 525.8
  Bottom Layer w10: R3.2 821.53,13 1198,13 1220,35 v1(1220,115)
NetLED3_1: LED3.1 R9.2 | length 83.1
  Top Layer w10: LED3.1 264.53,955 R9.2
NetLED4_1: LED4.1 R13.2 | length 179.9
  Top Layer w10: LED4.1 1231.53,948 1260,948 1269,939 1269,871 1285.47,854.53 R13.2
NetQ1_1: Q1.1 R10.2 R11.1 | length 423.5
  Top Layer w10: R11.1 R10.2 485,363.08 490.86,357.22 505.3,357.22 511.75,350.78 511.75,310.17 485,283.42 485,180 537.6,127.4 Q1.1
NetQ4_1: Q4.1 R25.1 R26.2 | length 162.6
  Bottom Layer w10: Q4.1 792.4,862.6 810,845 810,800.47 R26.2 R25.1
NetR13_1: R13.1 U8.29 | length 881.2
  Top Layer w8: U8.29 909.61,346.61 938,375 1071,375 1100,404 v1(1100,685)
  PWR w8: v1(1100,685) 1145.31,685 1150,689.69 1150,761.21 1158.79,770 1304.31,770 1314.31,780 v1(1315,780)
  Bottom Layer w8: v1@1312.83,777.83 v1(1315,780)
NetR18_2: R18.2 U9.A5 | length 135
  Top Layer w10: U9.A5 575.12,753.81 575.12,716.58 625.11,666.59 647.94,666.59 R18.2
NetR19_2: R19.2 U9.B5 | length 249.9
  Top Layer w8: R19.2 335.47,845 425,845 456.1,813.9 U9.B5
NetR21_1: R21.1 U8.22 | length 309.5
  Top Layer w8: U8.22 751.21,368.18 776.93,368.18 781.75,373 v1(785,373)
  Bottom Layer w8: v1(785,373) 785,371.89 770,356.89 770,335.72 825.71,280 919.59,280 925.44,274.14 925.44,259.69 930.13,255 R21.1
NetR22_1: R22.1 U8.24 | length 503.9
  Top Layer w10: U8.24 757.05,303.15 788.09,334.18 788.09,345.09 v1(790,347)
  GND w10: v1(790,347) 821.3,347 834.3,360 945.86,360 1076.94,228.91 1135.09,228.91 v1(1137,227)
  Bottom Layer w10: R22.1 1137,247.53 v1(1137,227)
NetR23_1: R23.1 U8.25 | length 466.6
  Top Layer w8: v1(782,295) 782.81,294.19 782.81,260.65 U8.25
  Bottom Layer w8: v1(782,295) 783,294 783,214.11 807.1,190 950.55,190 966,174.55 966,119.28 989,96.28 989,54.53 R23.1
NetR27_2: R27.2 U10.4 | length 96
  Bottom Layer w8: U10.4 1155.39,862.6 1198.72,819.27 1198.72,811.75 R27.2
OFF_FLAG: R11.2 U10.3 | length 1099.2
  Top Layer w10: v1(967,851) 1210,851 v1(1211,852)
  Bottom Layer w10: v1(540,353) 608,421 691.63,421 701,430.37 701,444.14 716.86,460 781.37,460 801.83,480.46 801.83,537.61 763,576.44 763,621.3 791,649.3 791,666.7 778,679.7 778,712.63 797.92,732.54 828.37,763 875.52,763 897.78,785.25 897.78,820.3 928.48,851 v1(967,851)
ON_FLAG: IC1.1 R1.2 U10.1 | length 1705.9
  Top Layer w8: v1(808,131) 808,129.89 793,114.89 793,63 802,54 859.78,54 IC1.1
  Top Layer w10: IC1.1 867.99,59.41 882.83,59.41 914.42,91 940.53,91 R1.2
  GND w8: v1(808,131) 810,133 810,188.12 759,239.12 759,377.28 775.22,393.51 933.56,393.51 1006.07,321 1057.28,321 1072.99,336.7 1083.7,336.7 v1(1086,339)
  Bottom Layer w8: v1(1086,339) 1087.55,339 1102.33,353.78 1139.89,353.78 1150,363.89 1150,761.21 1158.79,770 1226.11,770 1243.78,787.67 1243.78,821.72 1266.34,844.28 1266.34,916.93 1245.87,937.4 U10.1
POWER_CTRL: R25.2 U8.19 | length 521.3
  Top Layer w10: U8.19 757.05,460.63 778.69,439 v1(781,439)
  Bottom Layer w10: v1(781,439) 783,439 817.83,473.83 817.83,544.23 779,583.06 779,614.67 807,642.67 807,673.33 794,686.33 794,706 835,747 890.29,747 924.29,781 v1(927,781)
PROC_N: R17.1 U8.17 | length 603.5
  PWR w8: v1(770,523) v1@772,525
  Bottom Layer w8: R17.1 595,855.47 595,713 527.73,645.73 527.73,612.73 537.46,603 682.46,603 715,570.46 715,541.5 740,516.5 763.5,516.5 v1(770,523)
PROC_P: R16.1 U8.18 | length 629.4
  Bottom Layer w8: R16.1 425,850 460.79,814.21 460.79,714.21 509.73,665.27 509.73,605.27 530,585 675,585 700,560 700,531.04 732.54,498.5 763.5,498.5 v1(770,492)
RXD: LED2.2 U8.30 | length 439.7
  Top Layer w8: v1(938,290) 939.55,288.45 939.55,261.39 U8.30
  GND w8: v1(938,290) 941.25,290 947.25,284 980.85,284 1068.85,196 1101.85,163 1103.85,161 1200.72,161 1211.72,150 1260,150 v1(1280,130)
SCL: R20.2 U1.9 U2.2 U3.2 U4.2 U5.2 U6.2 U8.16 | length 2645.1
  Top Layer w8: U8.16 780.39,555.12 801,534.51 801,426.25 795,420.25 v1(795,417)
  Top Layer w10: v1(106,738) 106,692.21 142.47,655.75 142.47,475 ; U2.2 186.61,190 150,190 142.47,197.53 142.47,475 ; U6.2 142.79,474.68 142.47,475
  Bottom Layer w8: R20.2 435,40.47 435,200 480,245 710,245 735,270 735,373.08 778.92,417 854.14,417 U1.9
  Bottom Layer w10: v1(106,738) 127.68,716.32 U5.2 191.77,711.48 223.52,711.48 231.39,703.61 231.39,435 ; U3.2 231.07,150.32 231.39,150 ; U4.2 231.07,435.32 231.39,435 ; R20.2 389.53,85 244.01,85 231.39,97.61 231.39,150 ; 231.39,150 231.39,435
SDA: R24.2 U1.10 U2.3 U3.3 U4.3 U5.3 U6.3 U8.15 | length 3063
  Top Layer w8: U8.15 751.37,584.42 771.58,584.42 816,540 816,355.25 836,335.25 v1(836,332)
  Top Layer w10: U2.3 225.31,150.31 231.39,156.39 231.39,435 ; U6.3 231.08,435.31 231.39,435 ; v1(239.55,734.55) 239.55,710 231.39,701.84 231.39,435
  Bottom Layer w8: R24.2 281.22,14.25 454.42,14.25 460.28,20.11 460.28,64.72 449,76 449,194.2 485.8,231 715.8,231 749,264.2 749,367.28 778.72,397 803.28,397 803.4,397.11 810.03,397.11 832.83,374.31 832.83,366 863.83,335 U1.10
  Bottom Layer w10: U3.3 142.78,189.69 142.47,190 ; U4.3 142.78,474.69 ; v1(239.55,734.55) 223.25,750.85 191.77,750.85 U5.3 183.62,759 97.3,759 85,746.7 85,714 142.47,656.53 142.47,499.66 142.78,499.35 142.78,474.69 ; R24.2 160,40 142.47,57.53 142.47,190 ; 142.47,190 142.47,475 142.78,474.69
TXD: LED1.2 U8.31 | length 435.3
  Top Layer w8: v1(960,307) 960,303.75 972.6,291.15 U8.31
  GND w8: v1(960,307) 977.64,307 1109.64,175 1189,175 1204,190 1271.75,190 1276.75,185 v1(1280,185)
VBAT: C5.2 C6.2 C9.2 C12.2 C13.2 C15.2 IC2.3 JP1.1 Q1.2 R10.1 R14.1 U10.5 | length 2259.7
  Top Layer w30: C12.2 C9.2 340,330.47 ; JP1.1 340.94,329.53 340,330.47 ; R10.1 C6.2 340,330.47 ; Q1.2 597.01,52.6 642.62,98.21 642.62,107.75 673.87,139 v2(674,139)
  PWR w30: v2(351,190) 351,183.16 373.16,161 514,161 542,189 v2(543,189) 544,190 1011.43,190 1029,207.57 1029,703.09 1071,745.09 1071,774.91 1042,803.91 v2(1042,824)
  Bottom Layer w30: v2(543,189) 624,189 674.53,138.47 R14.1 ; v2(1042,824) 1040.28,822.28 1040.28,800.75 C13.2 C15.2 1095.47,882.43 1113.05,900 U10.5
VIN: C2.1 IC1.4 Q1.3 | length 234.5
  Top Layer w15: IC1.4@758.42,127 770.23,127 774.94,131.71 774.94,134.87 797.07,157 827.47,157 C2.1
  Top Layer w30: Q1.3 695.43,90 698.62,93.19 698.62,104.53 721.09,127 IC1.4@758.42,127
VUSB: C3.2 C4.2 IC2.4 IC3.5 R9.1 U9.A4B9 U9.B4A9 | length 1327.2
  Top Layer w30: v2(595,300) 610,285 610,227 644,193 C4.2
  PWR w30: v2(430,717) 442,729 609,729 v2(620,718) 620,653.77 711,562.77 711,426.23 642.77,358 612.57,358 595,340.43 v2(595,300)
  Bottom Layer w10: v1(312,880) 312,758 334.59,735.41 406.17,735.41 424.59,717 v2(430,717)
  Bottom Layer w20: IC3.5 520,740.71 554.71,706 v1(556,706)
pads on no net: J1.3 JP1.0 U1.1 U1.2 U1.3 U1.4 U1.5 U1.6 U1.7 U1.12 U2.5 U2.6 U3.5 U3.6 U4.5 U4.6 U5.5 U5.6 U6.5 U6.6 U7.5 U7.6 U8.4 U8.7 U8.9 U8.10 U8.12 U8.20 U8.21 U8.28 U8.32 U8.33 U8.34 U8.35 U9.A8 U9.B8
copper on no net:
  other v3: 1318.9,59.06 59.06,925.2 1318.9,925.2

## Polygon pours and split planes (outlines as drawn)
GND on Top Layer "GND_L01_P000" (solid, remove dead copper, pour order 0): 39.37,0 cw(c39.37,39.37) 0,39.37 0,944.88 cw(c39.37,944.88) 39.37,984.25 1338.58,984.25 cw(c1338.58,944.88) 1377.95,944.88 1377.95,39.37 cw(c1338.58,39.37) 1338.58,0
GND on GND "GND_L02_P001" (solid, remove dead copper, pour order 1): 39.37,0 cw(c39.37,39.37) 0,39.37 0,944.88 cw(c39.37,944.88) 39.37,984.25 1338.58,984.25 cw(c1338.58,944.88) 1377.95,944.88 1377.95,39.37 cw(c1338.58,39.37) 1338.58,0
GND on PWR "GND_L03_P002" (solid, remove dead copper, pour order 2): 39.37,0 cw(c39.37,39.37) 0,39.37 0,944.88 cw(c39.37,944.88) 39.37,984.25 1338.58,984.25 cw(c1338.58,944.88) 1377.95,944.88 1377.95,39.37 cw(c1338.58,39.37) 1338.58,0
GND on Bottom Layer "GND_L04_P003" (solid, remove dead copper, pour order 3): 39.37,0 cw(c39.37,39.37) 0,39.37 0,944.88 cw(c39.37,944.88) 39.37,984.25 1338.58,984.25 cw(c1338.58,944.88) 1377.95,944.88 1377.95,39.37 cw(c1338.58,39.37) 1338.58,0

## Keep-outs
Keep-Out Layer:
  lines w10: 1375,755 1165,755 1165,230 1380,230 ; 0,39.37 ccw(c39.37,39.37) 39.37,0 1338.58,0 ccw(c1338.58,39.37) 1377.95,39.37 1377.95,944.88 ccw(c1338.58,944.88) 1338.58,984.25 39.37,984.25 ccw(c39.37,944.88) 0,944.88 0,39.37 ; 530,437 530,551 531,552 685,552 685,437 530,437

## Other copper
Top Layer:
  pour cut-out: 530,552.5 685,552.5 685,437.5 530,437.5
Bottom Layer:
  pour cut-out: 530,555 685,555 685,440 530,440

## Silkscreen, mask and mechanical layers (free items; w line width, h text height)
Top Overlay:
  text "CHARGE" at 104.68,887.37 h50
  text "PWR" at 1147.46,887 h50
  text "PWR SW" at 927,801.44 h50
  text "RESET" at 219.46,609.37 h50
  text "BOOT" at 410.46,609.41 h50
  text "TX" at 1293.46,169 h50
  text "RX" at 1292.46,115 h50
Bottom Overlay:
  drawing of 9 lines, arcs and shapes, not listed
  text "LEFT   Ver. 1" at 1276.4,32.37 h45

## Text inside footprints (layer, text, board x,y; h text height)
U1: Bottom Overlay "SCL" at 715,354.68 h30 r180; Bottom Overlay "SDA" at 715,459.68 h30 r180; Bottom Overlay "TX" at 340,460 h30 r180; Bottom Overlay "RX" at 345,360 h30 r180; Bottom Overlay "GND" at 715,554.68 h30 r180; Bottom Overlay "GND" at 340,559.68 h30 r180; Bottom Overlay "VCC" at 715,254.68 h30 r180; Bottom Overlay "VCC" at 340,254.68 h30 r180